# Altium PCB DC-UPS-v1.0.PcbDoc (part 7 of 8)
Units mil, origin at the board's own origin, x right, y up, seen from the top; angles counter-clockwise.
Board outline 5905.51 x 3937.01 mil, 4 copper layers (Top Layer, SIG+PWR, SIG+GND, Bottom Layer), stack 62.449 mil thick; 278 components, 138 nets, 716 pads, 780 vias.
Unrouted connection lines stored in the file: 13.
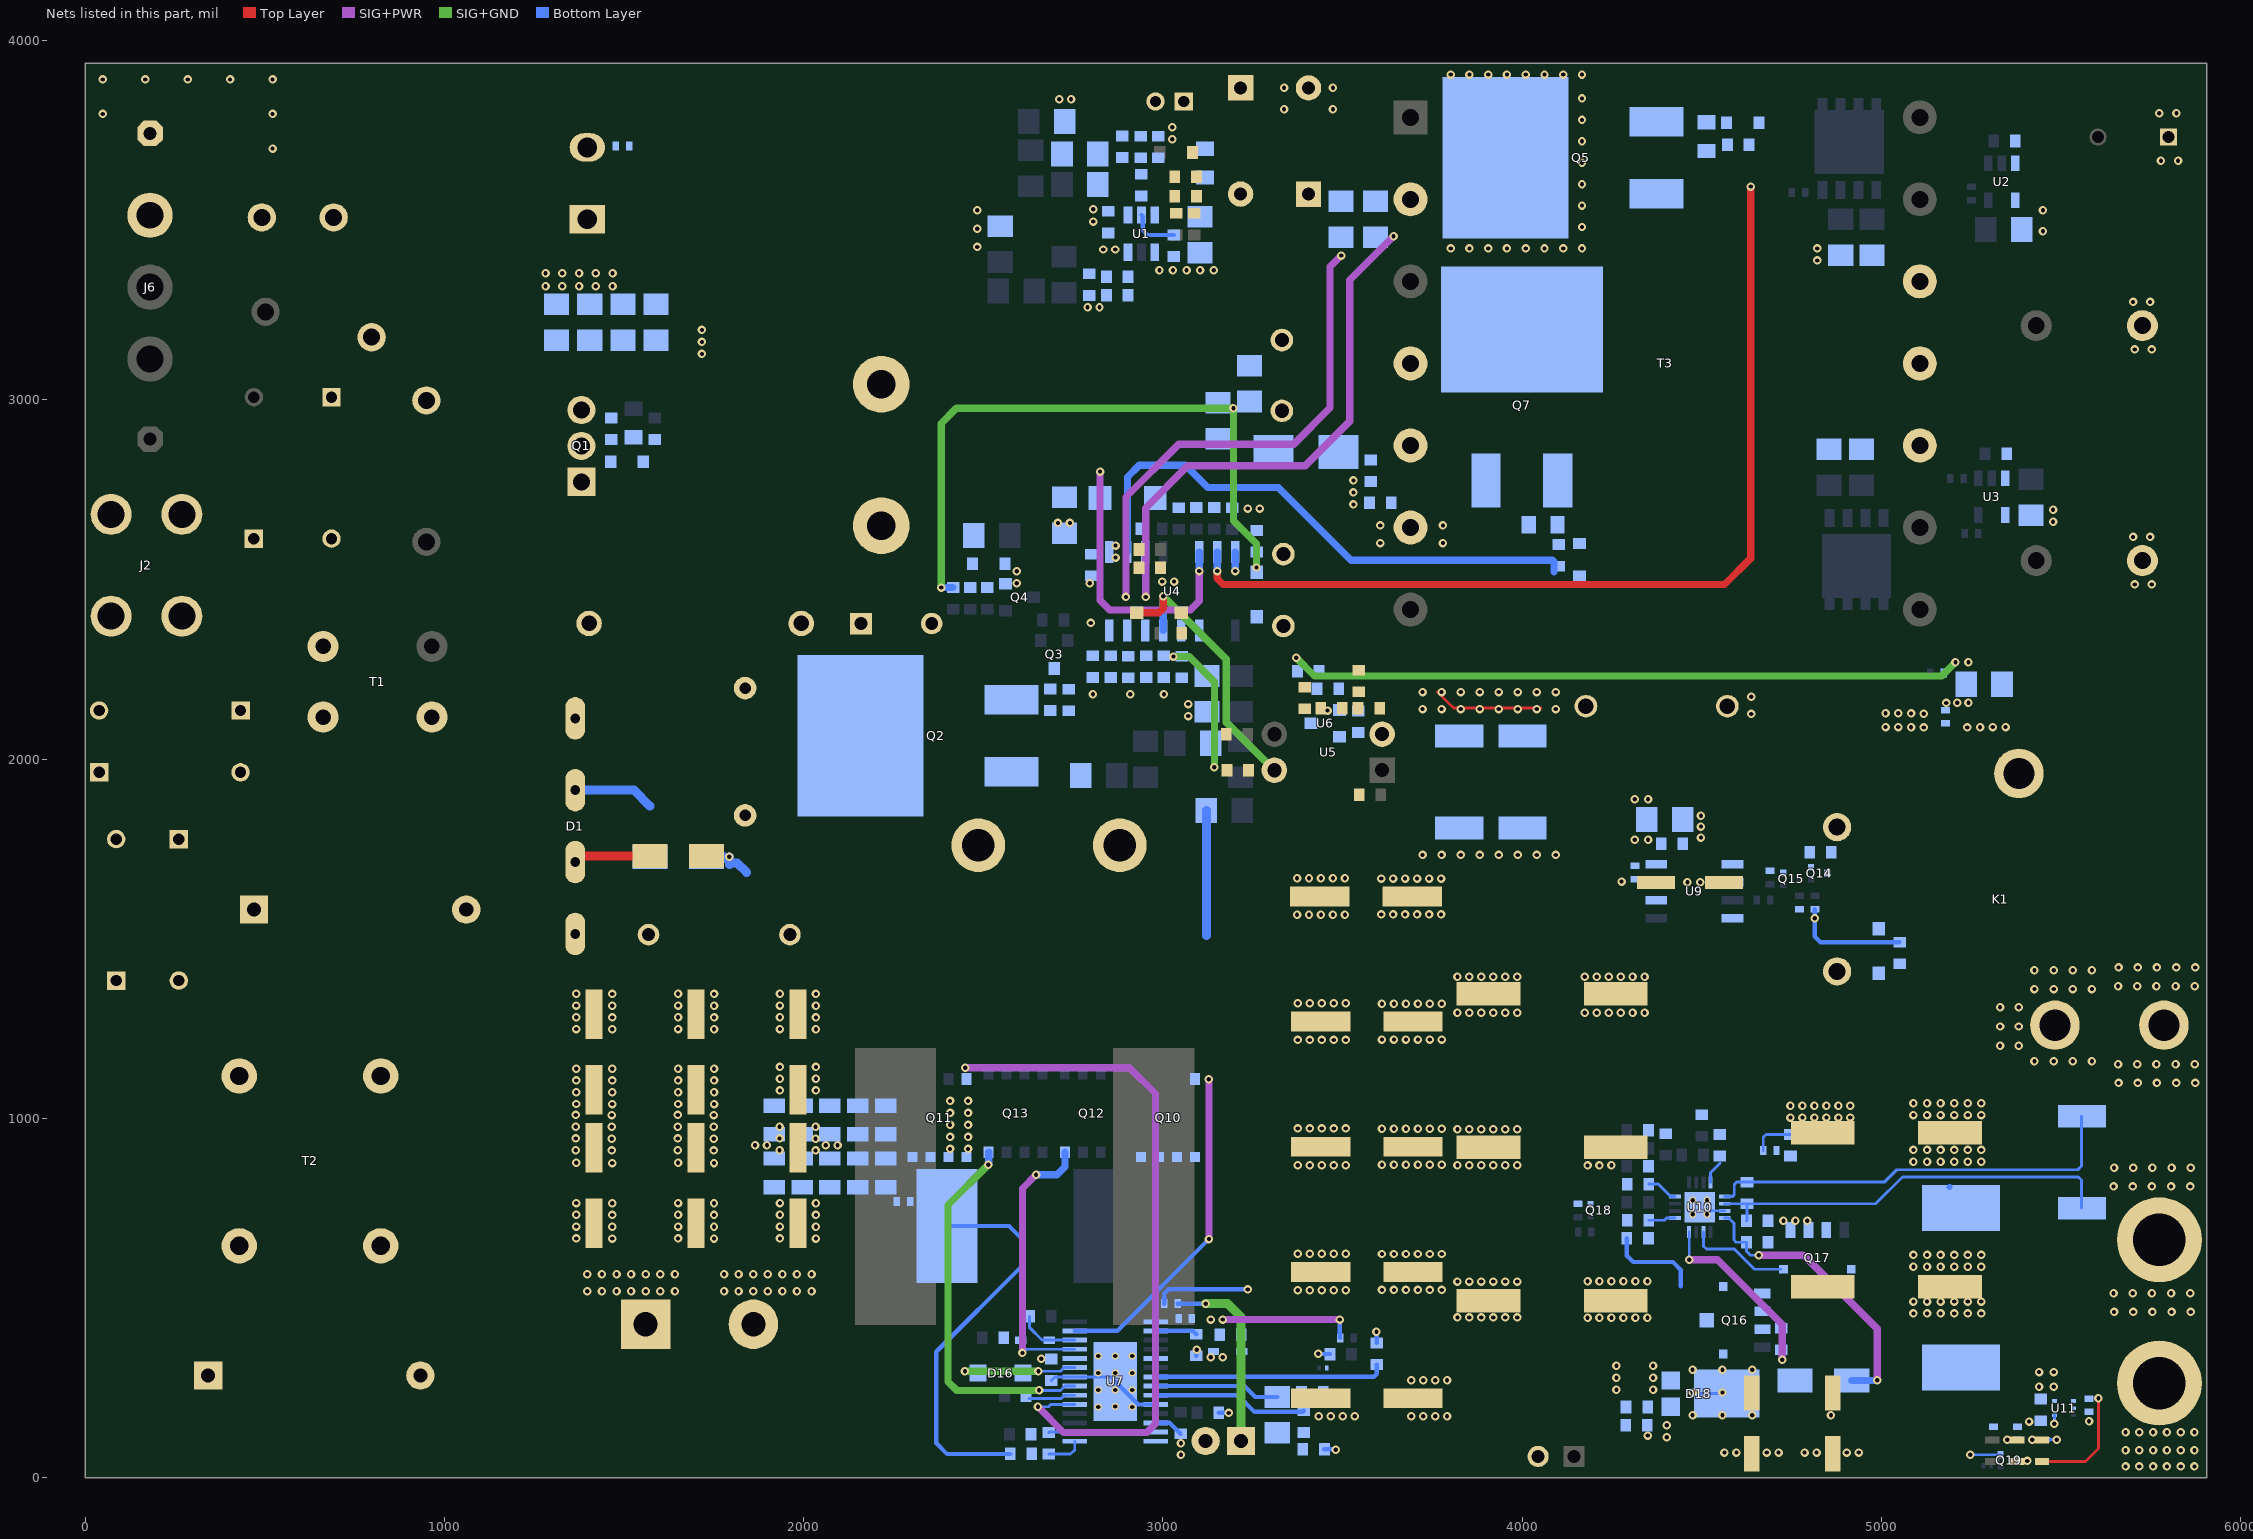
[diagram p4: the nets of this part, all layers, seen from the top]

## Via types
v1: diameter 23.62, hole 11.81, Top Layer to Bottom Layer, 767 vias
v2: diameter 19.69, hole 11.81, Top Layer to Bottom Layer, 12 vias
v3: diameter 23.62, hole 11.81, Top Layer to Bottom Layer, tented both sides, 1 vias

## Nets (pads, with @x,y where several pads share a name; then routed paths per layer and width w, separated by ;. In a path a pad name is that pad's centre, name@x,y a point inside that pad or via, vN(x,y) a via of type N, cw(c..) or ccw(c..) an arc to the next point about the centre after c; other vN are vias at no path point) (continued)
LDRV1: (continued)
  Bottom Layer w20: v1(2646.81,842.91) 2704.91,842.91 2726.91,864.9 Q12.4@2726.91,906.01
LDRV2: Q13.4 U7.21 | length 1053
  SIG+GND w20: v1(2514,871) 2402,759 2402,267 2426,243 v1(2655,243)
  Bottom Layer w8: v1(2655,243) 2715,243 2726.96,254.96 U7.21@2754.35,254.96
  Bottom Layer w20: v1(2514,871) 2514.91,871.9 Q13.4@2514.91,906.01
LV: F1.1 J3.1 J6.1
  other v1: 522,3699 49.33,3795.17 522,3795.17 49.33,3891.33 167.5,3891.33 285.67,3891.33 403.83,3891.33 522,3891.33
NetC2_2: C2.2 C5.2 T1.4 T2.1
NetC3_2: C3.2 C6.2 D1.2 D2.2 T2.4 | length 226.2
  Bottom Layer w25: D1.2@1364.35,1913.25 1528.03,1913.25 1572.26,1869.02
NetC4_1: C4.1 C9.1 F1.2 T1.2 VR1.1
NetC5_1: C5.1 C10.1 T1.3 T2.2
NetC6_1: C6.1 C11.1 D1.3 D3.2 T2.3 | length 216.8
  Top Layer w25: D1.3@1364.35,1713.25 1364.35,1716.34 1378.26,1730.25 D3.2@1572.26,1730.25
NetC7_2: C7.2 D1.1 L2.1
NetC8_2: C8.2 L1.2 L2.2
NetC12_1: C12.1 C25.2 D4.1 Q5.2 R4.2 R39.2
  other v1: 3800.84,3421 3853.03,3421 3905.22,3421 3957.41,3421 4009.59,3421 4061.78,3421 4113.97,3421 4166.16,3421 2483,3425 2483,3476 4166.16,3480.63 2483,3527 4166.16,3540.25 4166.16,3599.88 4166.16,3659.5 4166.16,3719.13 4166.16,3778.75 3337,3808 3473,3808 4166.16,3838.38 3337,3868 3473,3868 3800.84,3905 3853.03,3905 3905.22,3905 3957.41,3905 4009.59,3905 4061.78,3905 4113.97,3905 4166.16,3905
NetC12_2: C12.2 Q2.2 RT1.2
NetC13_1: C13.1 C15.2 C16.2 R7.1 R10.2 R12.2
NetC13_2: C13.2 D4.2 NT1.2 Q1.2 R1.2
  other v1: 2711,3836 2744.33,3836
NetC14_2: C14.2 Q2.1 Q3.3 R9.2
NetC15_1: C15.1 C16.1 Q1.3 R6.1 R10.1 R13.2 R14.2 R15.2 R16.2
  other v1: 1717,3127.33 1717,3160.67 1717,3194 3026,3724.67 3026,3758
NetC17_1: C17.1 D6.1 R18.2
NetC18_1: C18.1 R24.2
NetC18_2: C18.2 C19.2 U1.6
NetC20_1: C20.1 D7.1 R23.2
NetC21_2: C21.2 R23.1 U1.3
NetC22_2: C22.2 R12.1 U1.2 | length 135.8
  Bottom Layer w12: U1.2@2940,3513.83 2944,3509.83 2944,3471 2956.75,3458.25 C22.2@3030,3458.25
NetC23_2: C23.2 R19.1 R20.1 R25.2 R26.2 U1.1
  other v1: 2806,3495.67 2806,3530
NetC25_1: C25.1 C28.2 C29.2 C30.2 T3.2
NetC29_1: C29.1 C53.2 R48.2 U4.6 | length 1481.1
  SIG+PWR w20: v1(2952,2451) 2952,2698.81 3069.19,2816 3396,2816 3519.72,2939.72 3519.72,3332.97 v1(3641.76,3455)
NetC30_1: C30.1 C54.2 U4.7 | length 1385.4
  SIG+PWR w20: v1(2897,2451) 2897,2729.12 3044.08,2876.2 3363.79,2876.2 3465,2977.41 3465,3370 v1(3496,3401)
NetC34_2: C34.2 R46.1 R47.2 U4.9
  other v1: 2868.19,2560.67 2868.19,2594
NetC37_1: C37.1 NT2.2 NT3.2 R58.1 U6.3 | length 1871.4
  SIG+GND w20: v1(3371,2282) 3422,2231 5167.25,2231 v1(5205.48,2269.22)
  other v1: 5179.97,2156.25 5210.82,2156.78 5241.68,2156.78 5241.68,2269.22
NetC38_1: C38.1 C39.2 C46.1 D13.1 R22.1 R31.1 | length 1789.9
  SIG+GND w20: v1(2383,2477) 2383,2934.02 2424.98,2976 v1(3196,2976) 3196,2663 3260,2599 v1(3260,2533)
  Bottom Layer w20: v1(2383,2477) R22.1@2416,2477
NetC40_2: C40.2 U2.3
NetC42_2: C42.2 U3.3
NetC44_1: C44.1 Q5.3 Q7.2 R27.1 T3.4 U4.16 | length 53.5
  Bottom Layer w20: v1(3201,2523) U4.16@3201,2576.5
  other v1: 2707.67,2657 2741,2657
NetC44_2: C44.2 D12.1 U4.14 | length 792.2
  SIG+PWR w20: v1(2825,2800) 2825,2441.68 2851.66,2415.03 3076.03,2415.03 3101,2440 v1(3101,2523)
  Bottom Layer w20: v1(3101,2523) U4.14@3101,2576.5
NetC45_1: C45.1 C47.2 D13.2 U4.3
NetC52_1: C52.1 R55.1 R56.2 R58.2 U6.1
  other v1: 3458,2135
NetC52_2: C52.2 R50.1 R53.2 R54.2 R55.2
NetC55_2: C55.2 R32.1 R33.2 U4.8
  other v1: 2799,2378.81 3530,2708.67 3530,2742 3530,2775.33
NetC56_2: C56.2 R45.1 R49.2 U4.4 | length 381
  SIG+GND w20: v1(3029,2285) 3073,2285 3143,2215 v1(3143,1977)
NetC57_1: C57.1 R54.1 U5.2 U6.2
NetC57_2: C57.2 R56.1
NetC58_2: C58.2 D11.1 U4.5 U5.4 | length 820.2
  Top Layer w20: D11.1@2926.98,2407 2989,2407 3001,2419 v1(3001,2453)
  SIG+GND w20: v1(3001,2453) 3176.2,2277.8 3176.2,2102.59 U5.4@3310,1968.8
  Bottom Layer w20: U4.5@3001,2358 v1(3001,2453)
NetC74_2: C74.2 R66.1 U7.2 | length 116.8
  Bottom Layer w12: U7.2@2980,408.51 3083.74,408.51 C74.2@3093,399.25
NetC76_2: C76.2 D15.2 U7.26 | length 171.5
  Bottom Layer w8: C76.2@2629,449 2629,417 2663.08,382.92 2683.36,382.92 U7.26@2754.35,382.92
NetC77_2: C77.2 U7.8 | length 350.7
  Bottom Layer w12: U7.8@2980,254.96 3226.38,254.96 3256.92,224.42 C77.2@3318,224.42
NetC78_1: C78.1 R71.2
NetC78_2: C78.2 C79.2 U7.9 | length 432.7
  Bottom Layer w12: U7.9@2980,229.37 3208.63,229.37 3255,183 3389.22,183 C78.2@3392.22,186
NetC86_2: C86.2 D16.1 U7.20 | length 131.2
  Bottom Layer w8: C86.2@2627,220 2717,220 2726.37,229.37 U7.20@2754.35,229.37
NetC87_2: C87.2 U7.7 | length 644.4
  Bottom Layer w12: U7.7@2980,280.55 3586.55,280.55 3594.83,288.83 C87.2@3594.83,315
NetC88_1: C88.1 R73.2 U7.16 | length 72.8
  Bottom Layer w8: C88.1@2682,126 2683.01,127.01 U7.16@2754.35,127.01
NetC88_2: C88.2 R74.2 U7.15 | length 101.1
  Bottom Layer w8: C88.2@2682,66 2743,66 2754.35,77.35 U7.15@2754.35,101.42
NetC93_1: C93.1 R79.1 U9.2 U9.6
  other v1: 4459.7,1657.09 4495,1657
NetC94_1: C94.1 C95.1 D18.2 Q16.5_6 Q16.7 Q16.8 R81.2 | length 326.8
  Bottom Layer w8: D18.2@4493,233.75 D18.2@4559,233.75
  Bottom Layer w12: R81.2@4291,666.25 4291,617.65 4308.65,600 4419.24,600 4441.24,578 4441.24,532.49
  other v1: 4474,174 4557,174 4640,174 4859,174 4474,237 4557,237 4474,300 4557,300 4640,300
NetC96_1: C96.1 R80.1
NetC97_2: C97.2 R81.1 U10.1 | length 75.8
  Bottom Layer w8: C97.2@4352,716.42 4395.02,716.42 4401.57,722.97 U10.1@4425.1,722.97
NetC98_1: C98.1 L4.1 Q16.1 Q16.2 Q16.3 Q17.5_6 Q17.7 Q17.8 U10.14 | length 280.6
  Bottom Layer w8: U10.14@4503.84,683.6 4503.84,645.16 4512.76,636.24 4589.76,636.24 4646,580 Q17.7@4719,580
NetC98_2: C98.2 D19.1 U10.16 | length 516.4
  SIG+PWR w20: v1(4464.79,606.68) 4543.32,606.68 4723.43,426.57 v1(4723.43,328)
  Bottom Layer w8: v1@4464.47,607 U10.16@4464.47,683.6 ; v1@4723.43,320 v1(4723.43,328)
NetC100_2: C100.2 D19.2 U10.12 | length 809.6
  SIG+PWR w20: v1(4658,619) 4783,619 4987.71,414.29 v1(4987.71,270.79)
  Bottom Layer w8: U10.12@4562.9,722.97 4574.03,722.97 4589,708 4589,661 4595,655 C100.2@4624,655 4624,630 4635,619 v1(4658,619)
  Bottom Layer w20: D19.2@4916.48,270.79 v1(4987.71,270.79)
NetC103_2: C103.2 C105.1 L4.2 R84.1 U10.10 | length 1155.5
  Bottom Layer w8: U10.10@4562.9,762.34 C103.2@4625.34,762.34 ; C105.1@4624,715 4625.34,716.34 C103.2@4625.34,762.34 ; R84.1@5556,750 5556,828.18 5547.18,837 5057.73,837 4983.07,762.34 C103.2@4625.34,762.34
  Bottom Layer w15: L4.2@5188.76,808 L4.2@5190,809.24
NetC104_1: C104.1 R86.1 R89.2 U10.8 | length 180.2
  Bottom Layer w8: U10.8@4523.53,821.39 4523.53,848.53 4550,875 ; C104.1@4670.5,911 4670.5,947.5 4678,955 R86.1@4746.5,955
NetC106_1: C106.1 R93.2 U10.4 | length 87.5
  Bottom Layer w8: C106.1@4352,816.75 4379.25,816.75 4413.98,782.02 U10.4@4425.1,782.02
NetC108_2: C108.2 LED1.2 U11.1 | length 311.5
  Top Layer w8: LED1.2@5446.64,45.22 5567.28,45.22 5603.31,81.25 v3(5603.31,221.19)
NetD2_1: D2.1 D3.1 R42.1 | length 485.7
  Bottom Layer w25: D2.1@1743.02,1727.25 1781.75,1727.25 1797.85,1711.15 1814.35,1711.15 1841,1684.5 ; 1793,1706.29 v1(1793,1728) ; 3121,1508.73 R42.1@3121,1857
NetD5_1: D5.1 R5.2
NetD5_2: D5.2 Q1.1 R2.2 R6.2
NetD8_1: D8.1 R28.1 U4.15 | length 2630.3
  Top Layer w20: v1(3151,2523) 3151,2502.15 3167.15,2486 4563,2486 4636,2559 v1(4636,3593)
  Bottom Layer w20: v1(3151,2523) U4.15@3151,2576.5
NetD8_2: D8.2 Q5.1 R27.2 R28.2
NetD9_1: D9.1 R30.1 U4.10 | length 1548
  Bottom Layer w20: U4.10@2901,2576.5 2901,2784.61 2934.01,2817.62 3062.49,2817.62 3124.47,2755.64 3320.68,2755.64 3523.32,2553 4084,2553 4088,2549 4088,2521
NetD9_2: D9.2 Q7.1 R29.2 R30.2
NetD10_1: D10.1 R32.2 T3.5
NetD10_2: D10.2 R31.2
NetD11_2: D11.2 R36.1
NetD12_2: D12.2 R40.2
NetD14_2: D14.2 R66.2
NetD15_1: D15.1 D16.2 R69.2 U7.23 | length 309.6
  SIG+GND w20: v1(2449,296) v1(2653.43,296)
  Bottom Layer w8: v1(2653.43,296) 2715,296 2725.15,306.15 U7.23@2754.35,306.15
NetD17_1: D17.1 K1.2 Q14.3 R90.2
NetJ5_1: J5.1 R59.1 R65.2 U7.1 | length 537
  SIG+GND w25: v1(3118.81,484.25) 3179.75,484.25 3217.21,446.79 J5.1@3217.21,102
  Bottom Layer w12: R65.2@3040.5,484.25 v1(3118.81,484.25)
NetLED1_1: LED1.1 R95.1 | length 28.5
  Bottom Layer w8: v1@5413.13,106.02 R95.1@5441.64,106.02
  other v1: 5419.13,105.74
NetLED2_1: LED2.1 R91.1 | length 28.5
  Bottom Layer w8: v1@5349.5,105.28 R91.1@5378,105.28
  other v1: 5349.5,105.74
NetLED2_2: LED2.2 Q19.3
  other v1: 5405.14,46.69